# Altium PCB bunny_brain_D.PCBdoc (part 1 of 2)
Units mil, origin at the board's own origin, x right, y up, seen from the top; angles counter-clockwise.
Board outline 866.14 x 866.14 mil, 6 copper layers (Top Layer, GND1, SIG2/PWR, SIG1/PWR, GND2, Bottom Layer), stack 29.528 mil thick; 62 components, 94 nets, 390 pads, 189 vias.
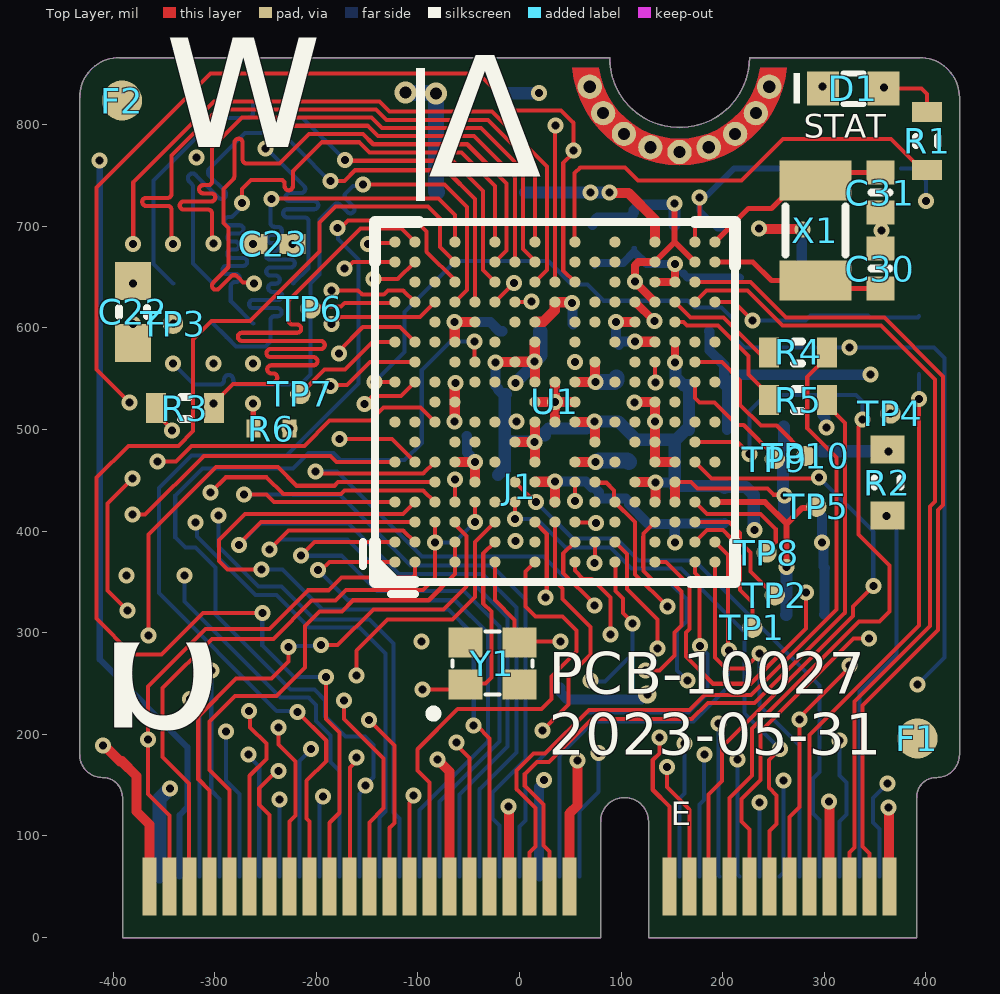
[diagram p0: Top Layer view]
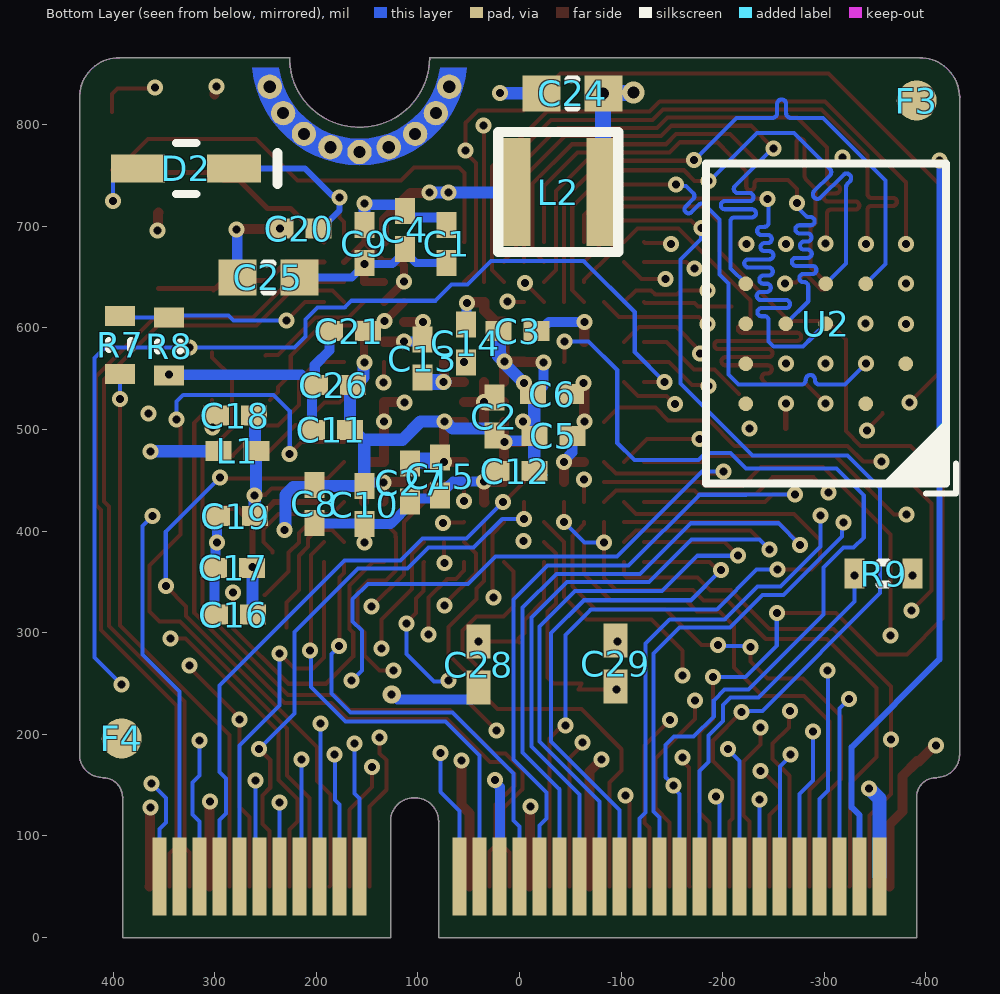
[diagram p1: Bottom Layer view, seen from below]
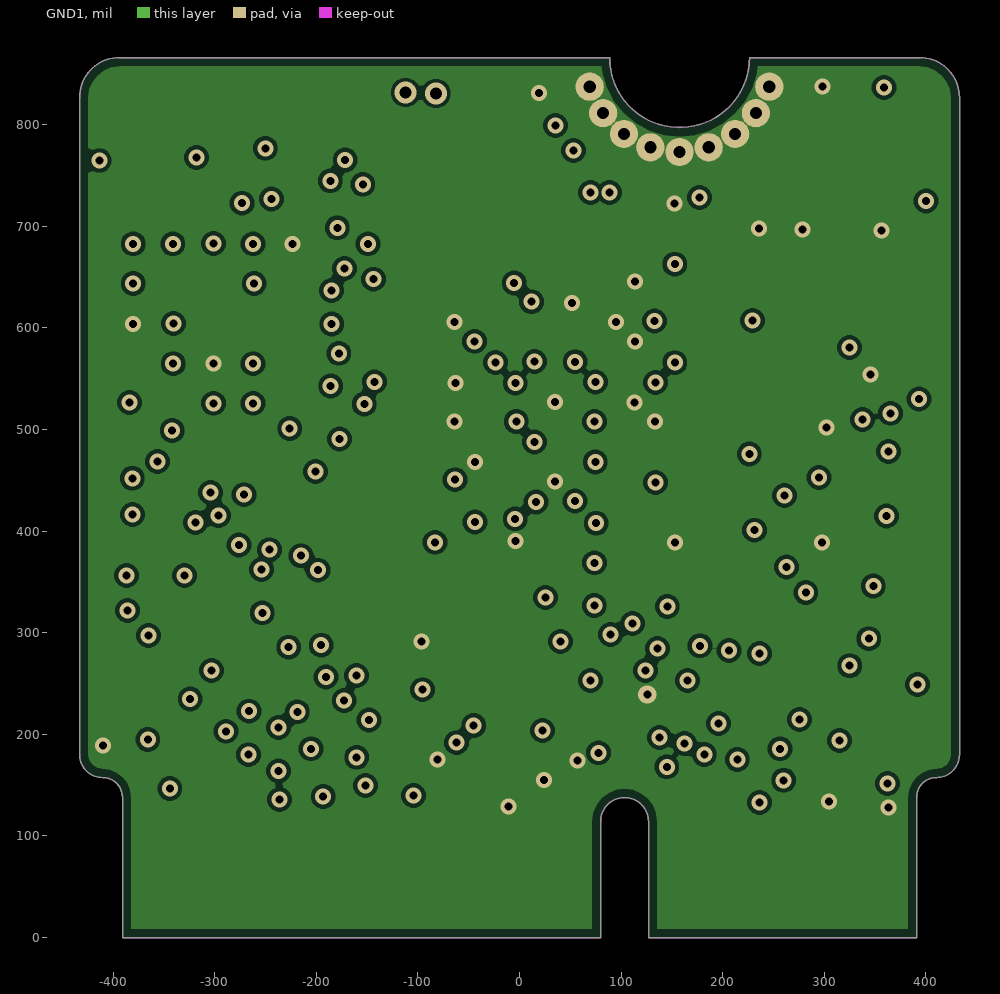
[diagram p2: GND1]
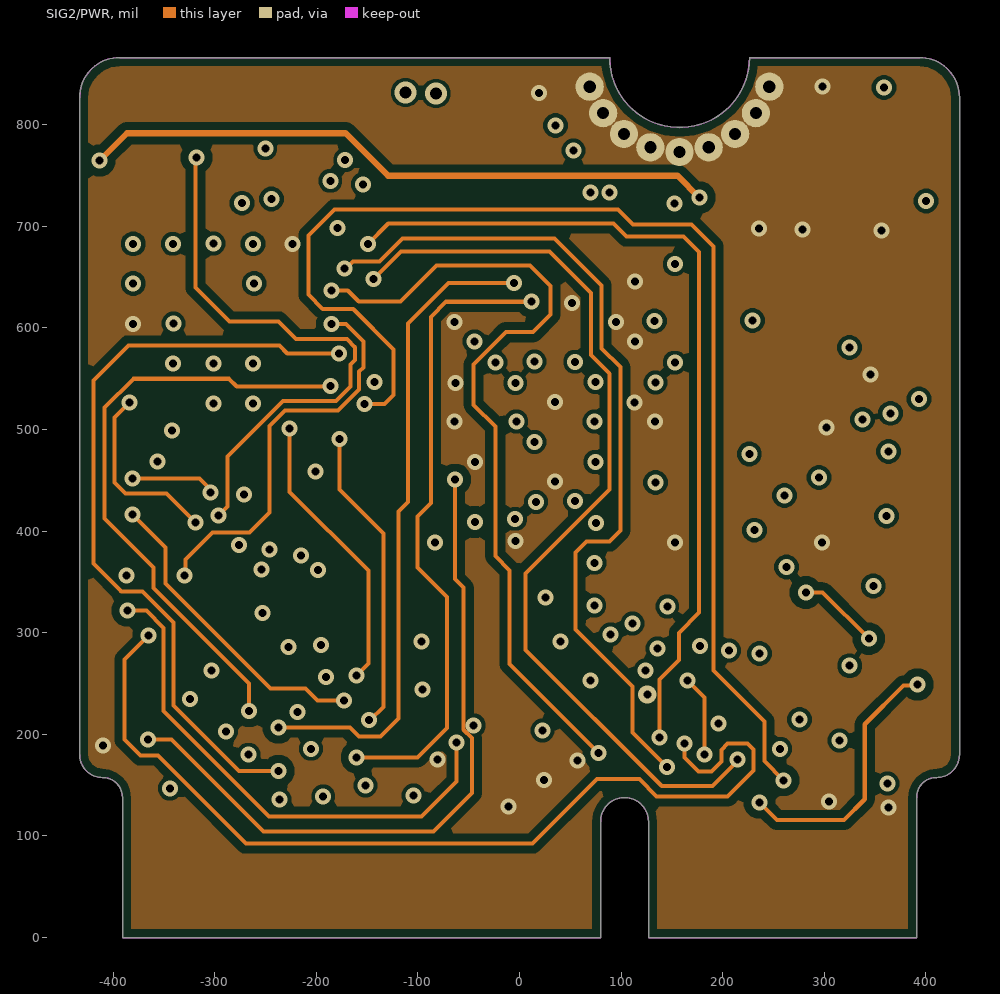
[diagram p3: SIG2/PWR]
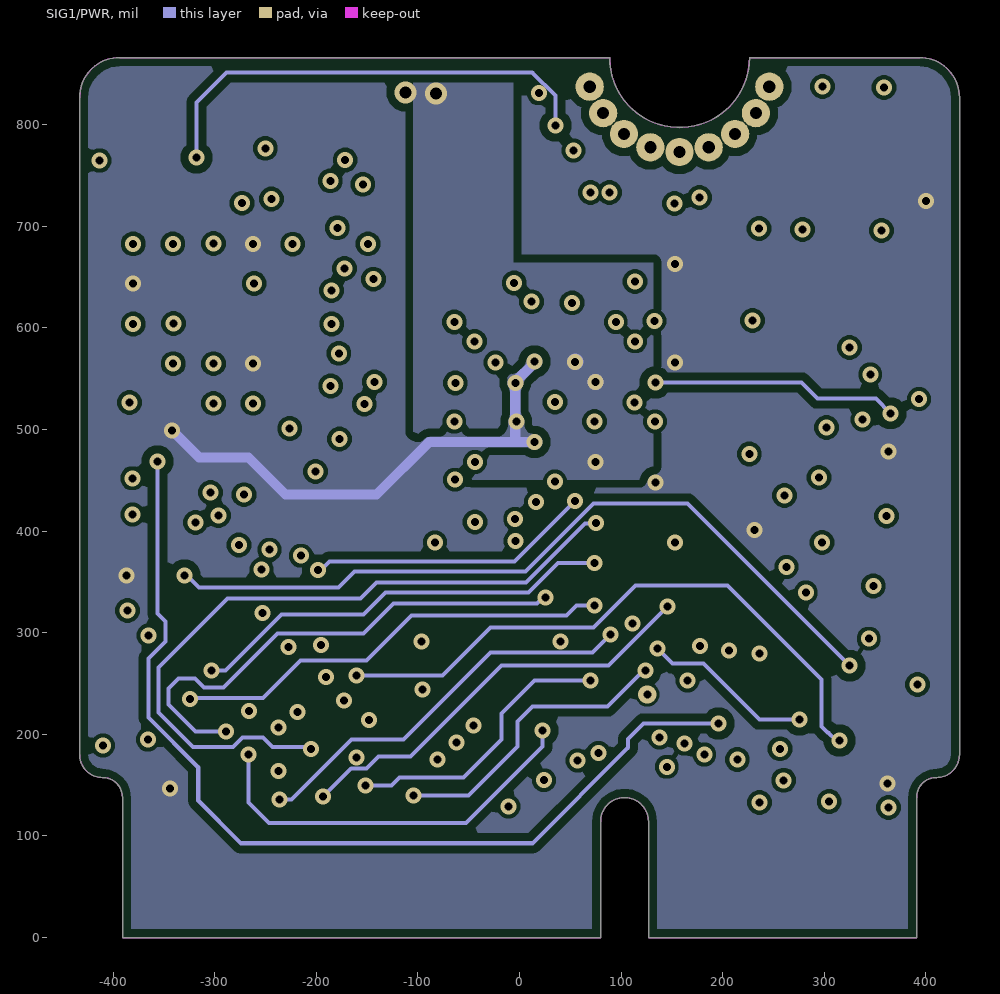
[diagram p4: SIG1/PWR]
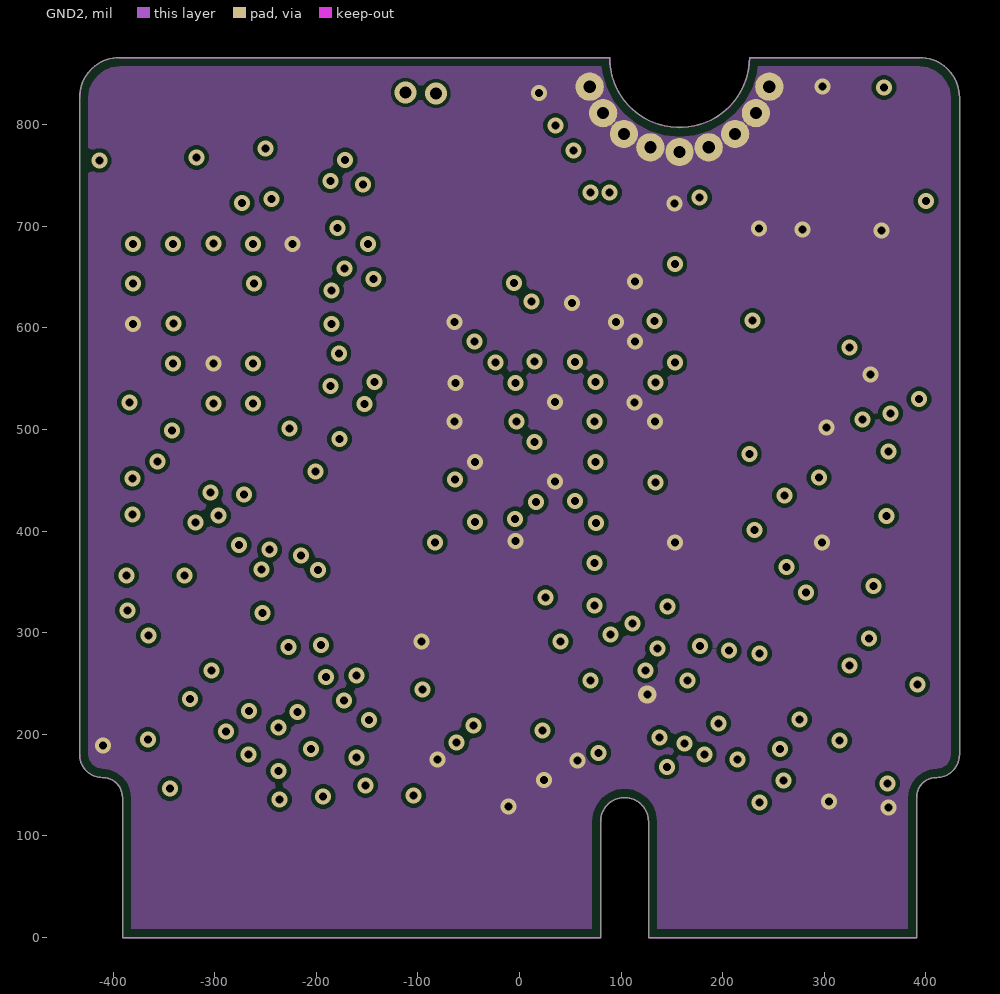
[diagram p5: GND2]
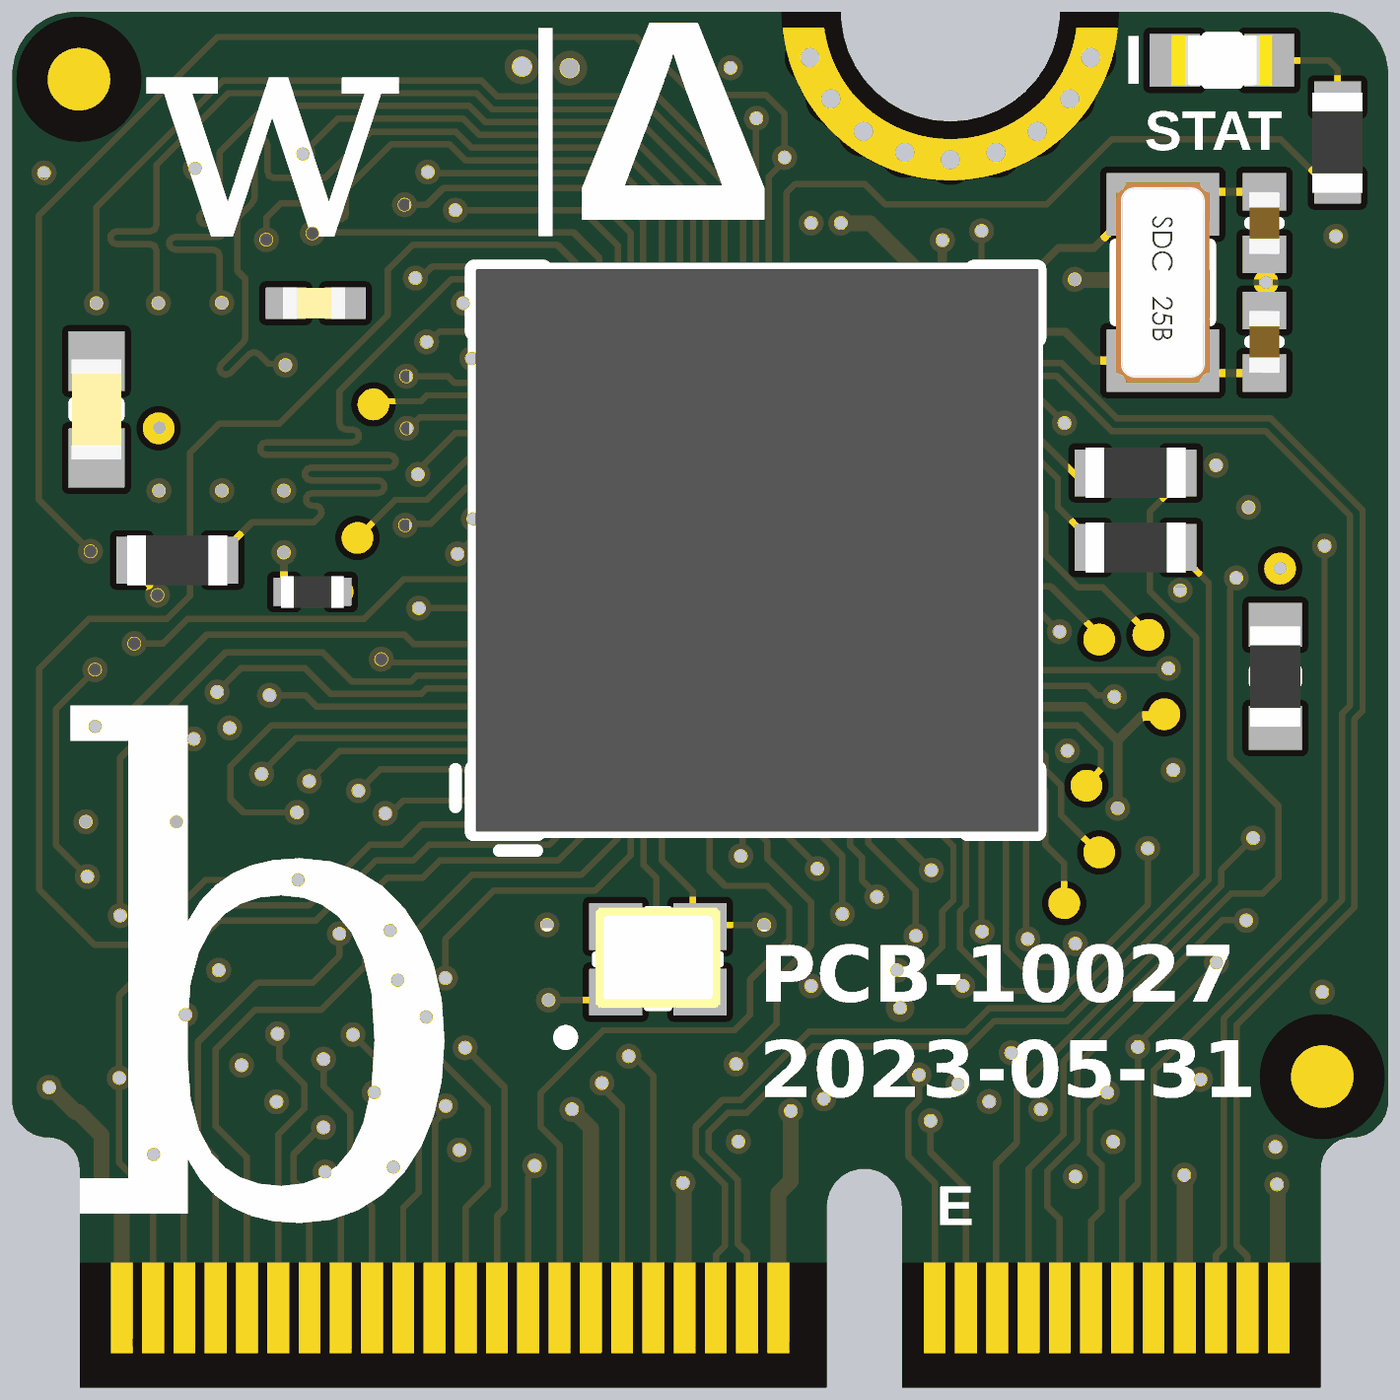
[diagram p7: 3D render of the assembled board from above, using the file's embedded part models]
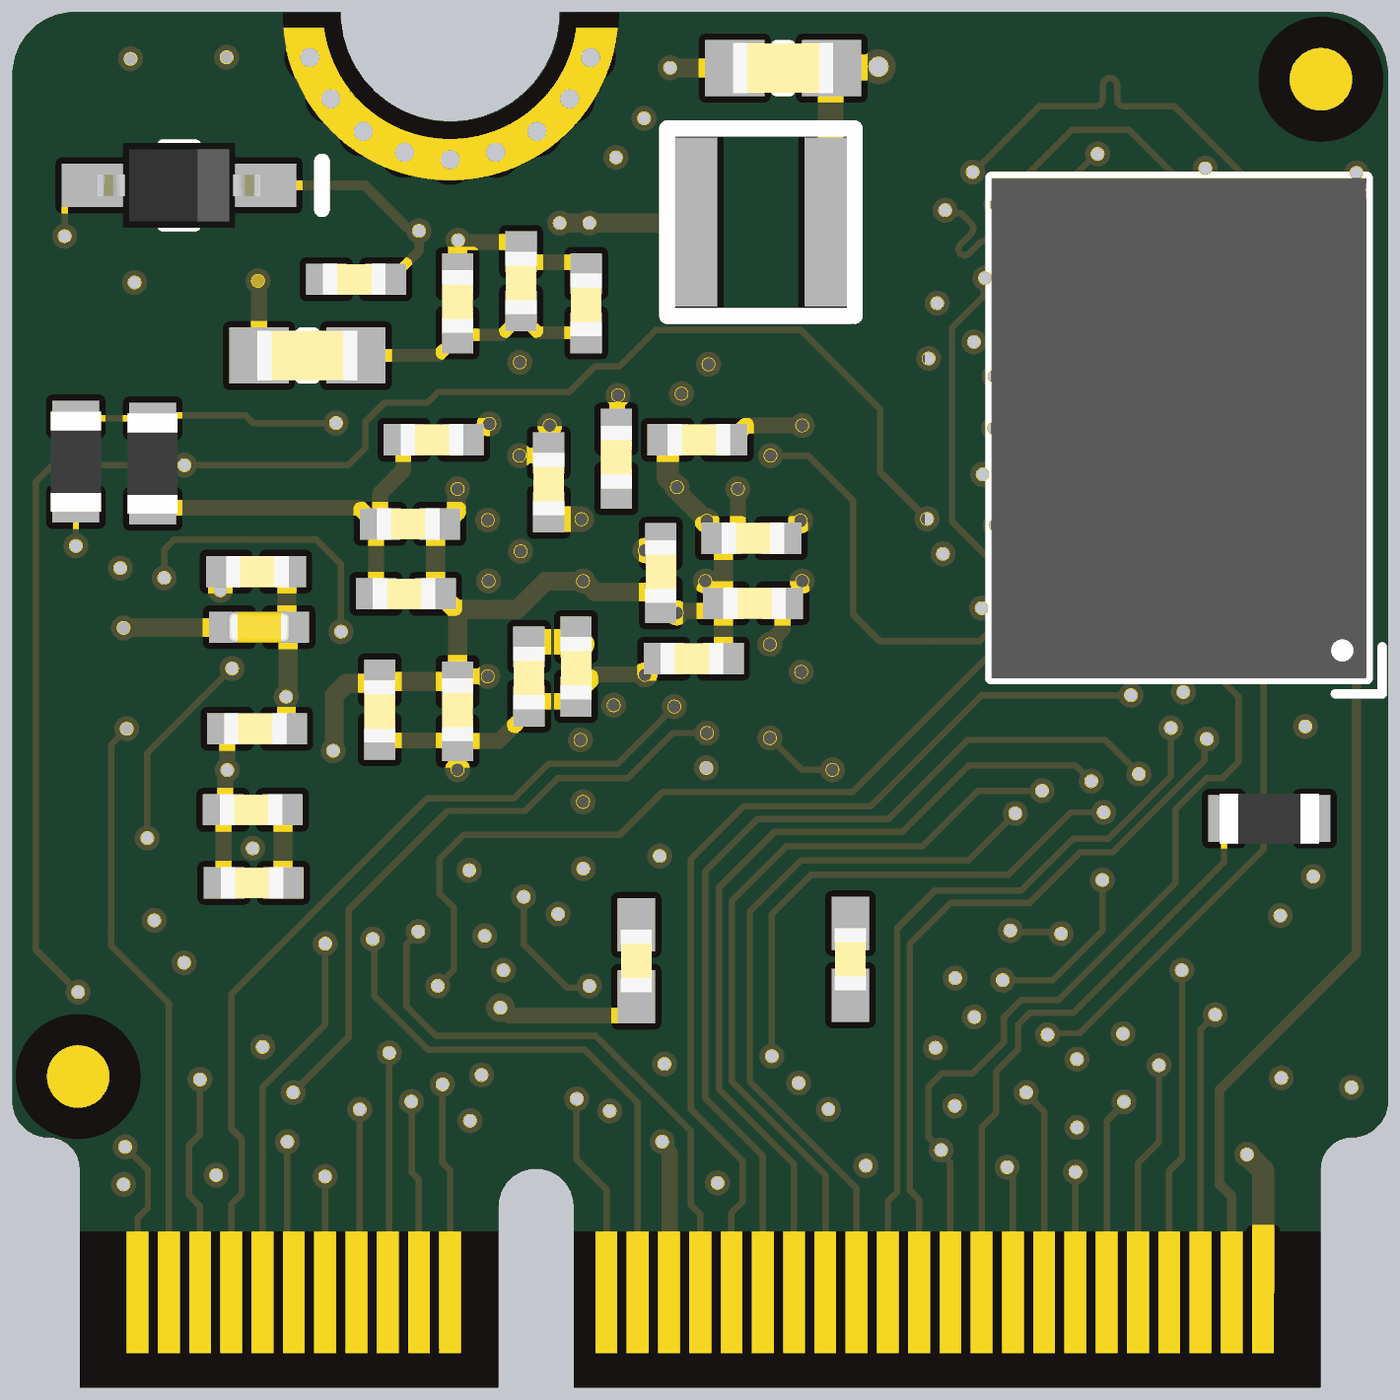
[diagram p8: 3D render of the assembled board from below, using the file's embedded part models]

## Layer stack, top to bottom
Top Solder: solder mask 0.9843, Solder Resist, Dk 3.5
Top Layer: signal copper 0.9843
Dielectric 1: prepreg 1.9685, PP-006, Dk 4.1
GND1: signal copper 1.9685
Dielectric 3: prepreg 3.937, PP-006, Dk 4.1
SIG2/PWR: signal copper 1.9685
Dielectric1: dielectric 7.874, FR-4, Dk 4.8
SIG1/PWR: signal copper 1.9685
Dielectric 4: prepreg 3.937, PP-006, Dk 4.1
GND2: signal copper 1.9685
Dielectric 2: prepreg 1.9685, PP-006, Dk 4.1
Bottom Layer: signal copper 0.9843
Bottom Solder: solder mask 0.9843, Solder Resist, Dk 3.5

## Board outline
-390.75,0 79.72,0 79.72,114.17 cw(c103.35,114.17) 126.97,114.17 126.97,0 390.75,0 390.75,137.8 cw(c410.43,137.8) 410.43,157.48 ccw(c410.43,180.12) 433.07,180.12 433.07,826.77 ccw(c393.7,826.77) 393.7,866.14 226.38,866.14 cw(c157.48,866.14) 88.58,866.14 -393.7,866.14 ccw(c-393.7,826.77) -433.07,826.77 -433.07,180.12 ccw(c-410.43,180.12) -410.43,157.48 cw(c-410.43,137.8) -390.75,137.8

## Design rules (kind name [scope] priority, off if disabled: settings)
Clearance [All] p1: gap=4 ignorepadtopadclearanceinfootprint=FALSE except(7.99: Track-Region; 8: Arc-Poly Arc-Region Track-Poly SMDPad-Poly SMDPad-Region THPad-Poly THPad-Region Via-Poly Via-Region Fill-Poly Fill-Region Poly-Poly Poly-Region Region-Region)
ComponentClearance ComponentClearance_1 [InComponent('J1')] p1: gap=-1 collisioncheckmode=3 verticalgap=-1 showdistances=FALSE
ComponentClearance [All] p2: gap=3 collisioncheckmode=3 verticalgap=5 showdistances=FALSE
DiffPairsRouting [All] p1: maxlimit=10 minlimit=10 mostfreqgap=10 toplayer_minwidth=15 toplayer_maxwidth=15 toplayer_prefwidth=15 midlayer1_minwidth=15 midlayer1_maxwidth=15 midlayer1_prefwidth=15 midlayer2_minwidth=15 midlayer2_maxwidth=15 midlayer2_prefwidth=15 midlayer3_minwidth=15 midlayer3_maxwidth=15 midlayer3_prefwidth=15 midlayer4_minwidth=15 midlayer4_maxwidth=15 midlayer4_prefwidth=15 bottomlayer_minwidth=15 bottomlayer_maxwidth=15 bottomlayer_prefwidth=15 maxuncoupledlength=500
MatchedLengths [InNetClass('OCTAL_SPI')] p1: tolerance=78.74 checknetsindiffpair=FALSE checkdiffpairvsdiffpair=TRUE checkxsignals=TRUE checkothers=TRUE
PlaneClearance [All] p1: clearance=10
PlaneConnect [All] p1: planeconnectstyle=Direct reliefexpansion=20 reliefentries=4 reliefconductorwidth=10 reliefairgap=10
PolygonConnect [All] p1: connectstyle=Direct reliefconductorwidth=10 reliefentries=4 polygonreliefangle="90 Angle" airgapwidth=5
RoutingVias [All] p1: holewidth=7.87 width=15.75 viastyle="Through Hole" minholewidth=6 minwidth=6 maxholewidth=50 maxwidth=75
SilkToSolderMaskClearance SilkscreenOverComponentPads [IsPad] p1: minsilkscreentomaskgap=10 clearancetoexposedcopper=TRUE
SolderMaskExpansion [All] p1: expansion=4 istentingtop=FALSE
SupplyNets "Schematic Supply Nets_7" [InNet('+5vUSB')] p1: voltage=0.000
SupplyNets "Schematic Supply Nets_6" [InNet('VDD_CORE')] p2: voltage=0.000
SupplyNets "Schematic Supply Nets_5" [InNet('VDD_VBAT')] p3: voltage=0.000
SupplyNets "Schematic Supply Nets_4" [InNet('+3v3')] p4: voltage=0.000
SupplyNets "Schematic Supply Nets_3" [InNet('VREFO')] p5: voltage=0.000
SupplyNets "Schematic Supply Nets_2" [InNet('VDDA')] p6: voltage=0.000
SupplyNets "Schematic Supply Nets_1" [InNet('GND')] p7: voltage=0.000
SupplyNets "Schematic Supply Nets" [InNet('VDD_SYS')] p8: voltage=0.000
Width [All] p1: maxlimit=200 minlimit=4 preferedwidth=4
25 further rules are at their usual default settings.

## Classes and differential pairs
differential pair class USB1: USB1
differential pair class USB0: USB0
net class OCTAL_SPI: FLEXSPI0A-D0 FLEXSPI0A-D1 FLEXSPI0A-D2 FLEXSPI0A-D3 FLEXSPI0A-D4 FLEXSPI0A-D5 FLEXSPI0A-D6 FLEXSPI0A-D7 FLEXSPI0A-DQS FLEXSPI0A-SCK FLEXSPI0A-SS0-N
differential pair USB1: +USB1_P -USB1_N
differential pair USB0: +USB0_P -USB0_N

## Components (designator, comment, footprint, x,y, rotation, side; value= is the part's Value field where it differs from the comment)
C1 "1µF" C0402_0.55MM_HD 71.8,682.77 r90 bottom
C2 "0.1µF" C0402_0.55MM_HD 24.8,512.77 r270 bottom
C3 "0.1µF" C0402_0.55MM_HD 1.8,596.77 r0 bottom
C4 "1µF" C0402_0.55MM_HD 112.8,696.47 r90 bottom
C5 "0.1µF" C0402_0.55MM_HD -33.2,493.77 r0 bottom
C6 "0.1µF" C0402_0.55MM_HD -32.2,534.77 r0 bottom
C8 "0.1µF" C0402_0.55MM_HD 201.8,426.77 r90 bottom
C9 "0.1µF" C0402_0.55MM_HD 152.8,682.77 r270 bottom
C10 "1µF" C0402_0.55MM_HD 152.8,425.77 r270 bottom
C11 "0.1µF" C0402_0.55MM_HD 185.44,499.77 r180 bottom
C12 "0.1µF" C0402_0.55MM_HD 4.18,458.95 r180 bottom
C13 "1µF" C0402_0.55MM_HD 95.4,569.83 r90 bottom
C14 "0.1µF" C0402_0.55MM_HD 52.8,584.77 r270 bottom
C15 "0.1µF" C0402_0.55MM_HD 78.18,453.95 r90 bottom
C16 "0.1µF" C0402_0.55MM_HD 281.16,317.77 r180 bottom
C17 "0.1µF" C0402_0.55MM_HD 281.8,363.77 r180 bottom
C18 "1µF" C0402_0.55MM_HD 279.8,513.77 r0 bottom
C19 "0.1µF" C0402_0.55MM_HD 279.16,414.77 r180 bottom
C20 "0.1µF" C0402_0.55MM_HD 216.8,697.77 r180 bottom
C21 "0.1µF" C0402_0.55MM_HD 167.8,596.77 r180 bottom
C22 "4.7µF" C0603_1.00MM_MD -380.2,615.77 r270 top
C23 "0.1µF" C0402_0.55MM_HD -242.2,682.77 r0 top
C24 "10µF" C0603_0.90MM_MD -52.2,830.77 r180 bottom
C25 "4.7µF" C0603_1.00MM_MD 247.31,649.77 r0 bottom
C26 "0.1µF" C0402_0.55MM_HD 182.8,543.77 r180 bottom
C27 "0.1µF" C0402_0.55MM_HD 107.8,447.77 r90 bottom
C28 "12pF" C0402_0.55MM_MD 40.28,268.65 r270 bottom
C29 "12pF" C0402_0.55MM_MD -94.56,269.64 r90 bottom
C30 "9.5pF" PERFECT_0402 355.24,658.42 r90 top
C31 "9.5pF" PERFECT_0402 355.24,733.22 r270 top
D1 "APT1608CGCK" "LED_0603 - GREEN" 328.74,835.63 r180 top
D2 "BAT760-7" D_SOD-323_P 328.18,756.95 r180 bottom
F1 "PCB Fiducial" "Fiducial 1mm - 2mm" 391.66,195.82 r180 top
F2 "PCB Fiducial" "Fiducial 1mm - 2mm" -391.2,823.77 r180 top
F3 "PCB Fiducial" "Fiducial 1mm - 2mm" -390.82,823.77 r0 bottom
F4 "PCB Fiducial" "Fiducial 1mm - 2mm" 391.66,195.82 r0 bottom
J1 "Micromod 2222 Card Edge Fingers" MICROMOD-CARD--M2--2222 0,0 r0 top locked
L1 "ACML-0402HC-221-T" C0402_HD 277.8,478.77 r180 bottom
L2 "2.2µH 1.5A" L_NRH3012 -38.2,733.77 r0 bottom
R1 "1k" R0603_0.55MM_HD 401.24,783.95 r270 top
R2 "10k" R0603_0.55MM_MD 362.13,447.79 r90 top
R3 "10k" R0603_0.55MM_HD -329.36,520.95 r180 top
R4 "33" R0603_0.55MM_HD 274.18,575.95 r180 top
R5 "33" R0603_0.55MM_HD 274.18,528.95 r180 top
R6 "0" R0402_0.40MM_HD -244.17,500.94 r180 top
R7 "10k" R0603_0.55MM_HD 393.18,582.95 r270 bottom
R8 "20k" R0603_0.55MM_HD 344.8,581.77 r90 bottom
R9 "10k" R0603_0.55MM_HD -358.34,358.22 r180 bottom
TP1 "SMT_TEST" "SMT_TP - 20"#1 229.18,304.95 r270 top
TP2 "SMT_TEST" "SMT_TP - 20"#1 251.18,336.95 r180 top
TP3 "SMT_TEST" "SMT_TP - 20"#2 -341.98,604 r180 top
TP4 "SMT_TEST" "SMT_TP - 20"#1 365.09,515.7 r180 top
TP5 "SMT_TEST" "SMT_TP - 20"#1 292.18,423.95 r270 top
TP6 "SMT_TEST" "SMT_TP - 20"#1 -205.78,619.05 r180 top
TP7 "SMT_TEST" "SMT_TP - 20"#1 -215.82,534.95 r180 top
TP8 "SMT_TEST" "SMT_TP - 20"#1 243.18,378.95 r180 top
TP9 "SMT_TEST" "SMT_TP - 20"#1 251.18,470.95 r180 top
TP10 "SMT_TEST" "SMT_TP - 20"#1 282.18,473.95 r180 top
U1 "MCXN947VDFT" VFBGA184 34.86,527.08 r90 top locked
U2 "APS6408L-3OBM-BA" BGA24C100P5X5_600X800X120 -301.46,604.14 r0 bottom locked
X1 "32.768kHz" XTAL_3215 291.27,695.82 r270 top
Y1 "24MHz" ECS-1637B -26.65,269.64 r0 top

## Footprints (in the part's own frame and the unit in brackets; to place one, negate y for a bottom-side part, rotate by r counter-clockwise, add the part's x,y. Pads: shape width x height; smd on the part's side, far side on the other; paste and mask are expansions set on the pad)
BGA24C100P5X5_600X800X120 [mm]
  round 0.37 smd: A2(-1,2) A3(0,2) A4(1,2) A5(2,2) B1(-2,1) B2(-1,1) B3(0,1) B4(1,1) B5(2,1) C1(-2,0) C2(-1,0) C3(0,0) C4(1,0) C5(2,0) D1(-2,-1) D2(-1,-1) D3(0,-1) D4(1,-1) D5(2,-1) E1(-2,-2) E2(-1,-2) E3(0,-2) E4(1,-2) E5(2,-2)
  silkscreen extent -3.25,-4 3,4.25, body extent -3,-4 3,4, height 1.2
C0402_0.55MM_HD [mm] "Capacitor 0402 0.55mm Height- High Density"
  rect 0.65x0.5 smd: 1(-0.475,0) 2(0.475,0)
  body extent -0.52,-0.25 0.48,0.25, height 0.55
C0402_0.55MM_MD [mm] "Capacitor - 0402 - Medium Density"
  rect 0.85x0.6 smd: 1(-0.575,0) 2(0.575,0)
  body extent -0.5,-0.25 0.5,0.25, height 0.55
C0402_HD [mm] "Capacitor 0402 - High Density"
  rect 0.65x0.5 smd: 1(-0.475,0) 2(0.475,0)
  body extent -0.5,-0.25 0.5,0.25, height 0.55
C0603_0.90MM_MD [mm] "Capacitor 0603 - Medium Density"
  rect 0.95x0.9 smd: 1(-0.775,0) 2(0.775,0)
  silkscreen extent -0.1,-0.35 0.1,0.35, body extent -0.8,-0.4 0.8,0.4, height 0.9
C0603_1.00MM_MD [mm] "Capacitor 0603 - Medium Density"
  rect 0.95x0.9 smd: 1(-0.775,0) 2(0.775,0)
  silkscreen extent -0.1,-0.35 0.1,0.35, body extent -0.8,-0.4 0.8,0.4, height 1
D_SOD-323_P [mm] "SOD-123 Diode - Polarized"
  rect 1.35x0.7 smd: 1(-1.2,0) 2(1.2,0)
  silkscreen extent -0.25,-0.64 2.29,0.64, body extent -1.3,-0.68 1.3,0.67, height 1.1
ECS-1637B [mm]
  rect 0.85x0.75 smd: 1(-0.675,-0.525) 2(0.675,-0.525) 3(0.675,0.525) 4(-0.675,0.525)
  silkscreen extent -1.57,-1.35 1,0.8, body extent -1,-0.77 1,0.83, height 0.5
"Fiducial 1mm - 2mm" [mm] "1mm Pad 2mm Opening"
  round 1 smd paste-10 mask+0.5: 1(0,0)
L_NRH3012 [mm] "Inductor"
  rect 0.8x2.7 smd: 1(-1.1,0) 2(1.1,0)
  silkscreen extent -1.5,-1.5 1.5,1.5, body extent -1.5,-1.5 1.5,1.5, height 1.2
"LED_0603 - GREEN" [mm] "LED_0603 - GREEN"
  rect 0.8x0.85 smd: A(-0.75,0) C(0.762,0)
  silkscreen extent -0.25,-0.38 0.25,0.38, body extent -0.8,-0.4 0.81,0.4, height 0.76
MICROMOD-CARD--M2--2222 [mm] "Micromod board outline with card edge fingers"
  rect 0.35x1.45 smd paste-2539.97 mask+0: 1(9.25,1.275) 3(8.75,1.275) 5(8.25,1.275) 7(7.75,1.275) 9(7.25,1.275) 11(6.75,1.275) 13(6.25,1.275) 15(5.75,1.275) 17(5.25,1.275) 19(4.75,1.275) 21(4.25,1.275) 23(3.75,1.275) 33(1.25,1.275) 35(0.75,1.275) 37(0.25,1.275) 39(-0.25,1.275) 41(-0.75,1.275) 43(-1.25,1.275) 45(-1.75,1.275) 47(-2.25,1.275) 49(-2.75,1.275) 51(-3.25,1.275) 53(-3.75,1.275) 55(-4.25,1.275) 57(-4.75,1.275) 59(-5.25,1.275) 61(-5.75,1.275) 63(-6.25,1.275) 65(-6.75,1.275) 67(-7.25,1.275) 69(-7.75,1.275) 71(-8.25,1.275) 73(-8.75,1.275) 75(-9.25,1.275)
  rect 0.35x1.95 smd far side paste-2539.97 mask+0: 2(9,1.525) 4(8.5,1.525) 6(8,1.525) 8(7.5,1.525) 10(7,1.525) 12(6.5,1.525) 14(6,1.525) 16(5.5,1.525) 18(5,1.525) 20(4.5,1.525) 22(4,1.525) 32(1.5,1.525) 34(1,1.525) 36(0.5,1.525) 38(0,1.525) 40(-0.5,1.525) 42(-1,1.525) 44(-1.5,1.525) 46(-2,1.525) 48(-2.5,1.525) 50(-3,1.525) 52(-3.5,1.525) 54(-4,1.525) 56(-4.5,1.525) 58(-5,1.525) 60(-5.5,1.525) 62(-6,1.525) 64(-6.5,1.525) 66(-7,1.525) 68(-7.5,1.525) 70(-8,1.525) 72(-8.5,1.525)
  rect 0.35x1.95 smd far side paste-2539.97: 74(-9,1.525)
  round 0.61 / inner round 0.708 / far side round 0.61 hole 0.305: SCREW(1.755,21.271) SCREW(2.09,20.611) SCREW(2.611,20.089) SCREW(3.271,19.755) SCREW(4,19.638) SCREW(4.729,19.755) SCREW(5.389,20.089) SCREW(5.91,20.611) SCREW(6.245,21.271)
  Top Layer region: 1.32,21.746 1.758,20.51 2.728,19.627 4,19.308 5.272,19.627 6.242,20.51 6.68,21.746 6.68,21.746 6.016,21.746 5.669,20.841 4.942,20.199 4,19.968 3.058,20.199 2.331,20.841 1.984,21.746 1.984,21.746
  Bottom Layer region: 1.32,21.746 1.758,20.51 2.728,19.627 4,19.308 5.272,19.627 6.242,20.51 6.68,21.746 6.68,21.746 6.016,21.746 5.669,20.841 4.942,20.199 4,19.968 3.058,20.199 2.331,20.841 1.984,21.746 1.984,21.746
PERFECT_0402 [mm] "https://www.worthingtonassembly.com/perfect-0402-footprint"
  rect 0.6x0.7 smd: 1(-0.5,0) 2(0.5,0)
  silkscreen extent 0,-0.23 0,0.23, body extent -0.5,-0.25 0.5,0.25, height 0.5
R0402_0.40MM_HD [mm] "Resistor 0402 High Density"
  rect 0.35x0.45 smd: 1(-0.45,0) 2(0.45,0)
  body extent -0.5,-0.25 0.5,0.25, height 0.4
R0603_0.55MM_HD [mm] "Resistor 0603 High Density"
  rect 0.5x0.75 smd: 1(-0.725,0) 2(0.725,0)
  silkscreen extent -0.1,-0.28 0.1,0.28, body extent -0.8,-0.4 0.8,0.4, height 0.55
R0603_0.55MM_MD [mm] "Resistor 0603 Medium Density"
  rect 0.7x0.85 smd: 1(-0.825,0) 2(0.825,0)
  silkscreen extent -0.1,-0.33 0.1,0.33, body extent -0.8,-0.4 0.8,0.4, height 0.55
"SMT_TP - 20"#1 [mil] ".020\" SMT Test pad"
  round 20 smd paste-25: 1(0,0)
"SMT_TP - 20"#2 [mil] ".020\" SMT Test pad"
  round 20 smd paste-25: 1(-0.98,0)
VFBGA184 [mm] "VFBGA184"
  round 0.28 smd mask+0.05: A1(-4,4) A2(-3.5,4) A4(-2.5,4) A6(-1.5,4) A8(-0.5,4) A10(0.5,4) A12(1.5,4) A14(2.5,4) A16(3.5,4) A17(4,4) B1(-4,3.5) B2(-3.5,3.5) B3(-3,3.5) B4(-2.5,3.5) B6(-1.5,3.5) B7(-1,3.5) B8(-0.5,3.5) B10(0.5,3.5) B11(1,3.5) B12(1.5,3.5) B14(2.5,3.5) B15(3,3.5) B16(3.5,3.5) B17(4,3.5) C3(-3,3) C4(-2.5,3) C5(-2,3) C6(-1.5,3) C8(-0.5,3) C9(0,3) C10(0.5,3) C12(1.5,3) C13(2,3) C14(2.5,3) C15(3,3) D1(-4,2.5) D2(-3.5,2.5) D3(-3,2.5) D4(-2.5,2.5) D6(-1.5,2.5) D7(-1,2.5) D9(0,2.5) D11(1,2.5) D12(1.5,2.5) D14(2.5,2.5) D15(3,2.5) D16(3.5,2.5) D17(4,2.5) E4(-2.5,2) E5(-2,2) E7(-1,2) E8(-0.5,2) E10(0.5,2) E11(1,2) E13(2,2) E14(2.5,2) F1(-4,1.5) F2(-3.5,1.5) F3(-3,1.5) F4(-2.5,1.5) F6(-1.5,1.5) F8(-0.5,1.5) F10(0.5,1.5) F12(1.5,1.5) F14(2.5,1.5) F15(3,1.5) F16(3.5,1.5) F17(4,1.5) G2(-3.5,1) G4(-2.5,1) G5(-2,1) G7(-1,1) G11(1,1) G13(2,1) G14(2.5,1) G16(3.5,1) H1(-4,0.5) H2(-3.5,0.5) H3(-3,0.5) H5(-2,0.5) H6(-1.5,0.5) H8(-0.5,0.5) H9(0,0.5) H10(0.5,0.5) H12(1.5,0.5) H13(2,0.5) H15(3,0.5) H16(3.5,0.5) H17(4,0.5) J3(-3,0) J4(-2.5,0) J8(-0.5,0) J10(0.5,0) J14(2.5,0) J15(3,0) K1(-4,-0.5) K2(-3.5,-0.5) K3(-3,-0.5) K5(-2,-0.5) K6(-1.5,-0.5) K8(-0.5,-0.5) K9(0,-0.5) K10(0.5,-0.5) K12(1.5,-0.5) K13(2,-0.5) K15(3,-0.5) K16(3.5,-0.5) K17(4,-0.5) L2(-3.5,-1) L4(-2.5,-1) L5(-2,-1) L7(-1,-1) L11(1,-1) L13(2,-1) L14(2.5,-1) L16(3.5,-1) M1(-4,-1.5) M2(-3.5,-1.5) M3(-3,-1.5) M4(-2.5,-1.5) M6(-1.5,-1.5) M8(-0.5,-1.5) M10(0.5,-1.5) M12(1.5,-1.5) M14(2.5,-1.5) M15(3,-1.5) M16(3.5,-1.5) M17(4,-1.5) N4(-2.5,-2) N5(-2,-2) N7(-1,-2) N8(-0.5,-2) N10(0.5,-2) N11(1,-2) N13(2,-2) N14(2.5,-2) P1(-4,-2.5) P2(-3.5,-2.5) P3(-3,-2.5) P4(-2.5,-2.5) P6(-1.5,-2.5) P7(-1,-2.5) P9(0,-2.5) P11(1,-2.5) P12(1.5,-2.5) P14(2.5,-2.5) P15(3,-2.5) P16(3.5,-2.5) P17(4,-2.5) R3(-3,-3) R4(-2.5,-3) R5(-2,-3) R6(-1.5,-3) R8(-0.5,-3) R9(0,-3) R10(0.5,-3) R12(1.5,-3) R13(2,-3) R14(2.5,-3) R15(3,-3) T1(-4,-3.5) T2(-3.5,-3.5) T3(-3,-3.5) T4(-2.5,-3.5) T6(-1.5,-3.5) T7(-1,-3.5) T8(-0.5,-3.5) T10(0.5,-3.5) T11(1,-3.5) T12(1.5,-3.5) T14(2.5,-3.5) T15(3,-3.5) T16(3.5,-3.5) T17(4,-3.5) U1(-4,-4) U2(-3.5,-4) U4(-2.5,-4) U6(-1.5,-4) U8(-0.5,-4) U10(0.5,-4) U12(1.5,-4) U14(2.5,-4) U16(3.5,-4) U17(4,-4)
  silkscreen extent -4.8,-4.5 4.5,4.8, body extent -4.5,-4.53 4.5,4.47, height 0.91
XTAL_3215 [mm] "XTAL SMD 3.2 x 1.5 mm"
  rect 1x1.8 smd: 1(-1.25,0) 2(1.25,0)
  silkscreen extent -0.6,-0.75 0.6,0.75, body extent -1.6,-0.75 1.6,0.75, height 0.81

## Part data
C1 C4 C10 C13 C18: library part GCM155C71A105KE38D, "CAP CER 1UF 10V X7S 0402", Manufacturer="Murata Electronics", Operating Temperature="-55°C ~ 125°C", Package=0402, Ratings=AEC-Q200, Supplier Part Number 1=490-13409-1-ND, Temperature Coefficient=X7S, Tolerance=±10%, Voltage - Rated=10V, Category=Capacitors, ComponentLink1Description="Datasheet (Internal)", ComponentLink1URL=https://www.murata.com/~/media/webrenewal/support/library/catalog/products/capacitor/mlcc/c03e.ashx?la=en-us, ComponentLink2Description="Datasheet (External)", ComponentLink2URL=https://www.murata.com/~/media/webrenewal/support/library/catalog/products/capacitor/mlcc/c03e.ashx?la=en-us, Manufacturer Part Number=GCM155C71A105KE38D, Substitution Notes="1µF , 10V , ±10% , X7S , -55°C ~ 125°C , AEC-Q200 , 0402", Supplier 1=Digikey, Thickness (Max)=0.55MM
C2 C3 C5 C6 C8 C9 C11 C12 C14 C15 C16 C17 C19 C20 C21 C23 C26 C27: library part GCM155R71A104KA55D, "CAP CER 0.1UF 10V X7R 0402", Manufacturer="Murata Electronics", Operating Temperature="-55°C ~ 125°C", Package=0402, Ratings=AEC-Q200, Supplier Part Number 1=490-16434-1-ND, Temperature Coefficient=X7R, Tolerance=±10%, Voltage - Rated=10V, Category=Capacitors, ComponentLink1Description="Datasheet (Internal)", ComponentLink1URL=https://search.murata.co.jp/Ceramy/image/img/A01X/G101/ENG/GCM155R71A104KA55-01.pdf, ComponentLink2Description="Datasheet (External)", ComponentLink2URL=https://search.murata.co.jp/Ceramy/image/img/A01X/G101/ENG/GCM155R71A104KA55-01.pdf, Manufacturer Part Number=GCM155R71A104KA55D, Substitution Notes="0.1µF , 10V , ±10% , X7R , -55°C ~ 125°C , AEC-Q200 , 0402", Supplier 1=Digikey, Thickness (Max)=0.55MM
C22 C25: library part GCJ188C70J475KE02D, "CAP CER 4.7UF 6.3V X7S 0603", Manufacturer="Murata Electronics", Operating Temperature="-55°C ~ 125°C", Package=0603, Ratings=AEC-Q200, Supplier Part Number 1=490-16480-1-ND, Temperature Coefficient=X7S, Tolerance=±10%, Voltage - Rated=6.3V, Category=Capacitors, ComponentLink1Description="Datasheet (Internal)", ComponentLink1URL=https://search.murata.co.jp/Ceramy/image/img/A01X/G101/ENG/GCJ188C70J475KE02-01.pdf, ComponentLink2Description="Datasheet (External)", ComponentLink2URL=https://search.murata.co.jp/Ceramy/image/img/A01X/G101/ENG/GCJ188C70J475KE02-01.pdf, Manufacturer Part Number=GCJ188C70J475KE02D, Substitution Notes="4.7µF , 6.3V , ±10% , X7S , -55°C ~ 125°C , AEC-Q200 , 0603", Supplier 1=Digikey, Thickness (Max)=1.00MM
C24: library part GRT188R61A106ME13D, "CAP CER 10UF 10V X5R 0603", Manufacturer="Murata Electronics", Operating Temperature="-55°C ~ 85°C", Package=0603, Ratings=AEC-Q200, Supplier Part Number 1=490-12312-1-ND, Temperature Coefficient=X5R, Tolerance=±20%, Voltage - Rated=10V, Category=Capacitors, ComponentLink1Description="Datasheet (Internal)", ComponentLink1URL=https://search.murata.co.jp/Ceramy/image/img/A01X/G101/ENG/GRT188R61A106ME13-01.pdf, ComponentLink2Description="Datasheet (External)", ComponentLink2URL=https://search.murata.co.jp/Ceramy/image/img/A01X/G101/ENG/GRT188R61A106ME13-01.pdf, Manufacturer Part Number=GRT188R61A106ME13D, Substitution Notes="10µF , 10V , ±20% , X5R , -55°C ~ 85°C , AEC-Q200 , 0603", Supplier 1=Digikey, Thickness (Max)=0.90MM
C28 C29: library part GCM1555C1H120JA16D, "CAP CER 12PF 50V C0G/NP0 0402", Manufacturer="Murata Electronics", Operating Temperature="-55°C ~ 125°C", Package=0402, Ratings=AEC-Q200, Supplier Part Number 1=490-12649-1-ND, Temperature Coefficient="C0G, NP0", Tolerance=±5%, Voltage - Rated=50V, Category=Capacitors, ComponentLink1Description="Datasheet (Internal)", ComponentLink1URL=https://www.murata.com/~/media/webrenewal/support/library/catalog/products/capacitor/mlcc/c03e.ashx?la=en-us, ComponentLink2Description="Datasheet (External)", ComponentLink2URL=https://www.murata.com/~/media/webrenewal/support/library/catalog/products/capacitor/mlcc/c03e.ashx?la=en-us, Manufacturer Part Number=GCM1555C1H120JA16D, Substitution Notes="12pF , 50V , ±5% , C0G, NP0 , -55°C ~ 125°C , AEC-Q200 , 0402", Supplier 1=Digikey, Thickness (Max)=0.55MM
C30 C31: library part GCQ1555C1H9R5BB01D, "CAP CER 9.5PF 50V C0G/NP0 0402", Manufacturer="Murata Electronics", Operating Temperature="-55°C ~ 125°C", Package=0402, Ratings=AEC-Q200, Supplier Part Number 1=490-17528-1-ND, Temperature Coefficient="C0G, NP0", Tolerance=±0.1pF, Voltage - Rated=50V, Category=Capacitors, ComponentLink1Description="Datasheet (Internal)", ComponentLink1URL=https://search.murata.co.jp/Ceramy/image/img/A01X/G101/ENG/GCQ1555C1H9R5BB01-01.pdf, ComponentLink2Description="Datasheet (External)", ComponentLink2URL=https://search.murata.co.jp/Ceramy/image/img/A01X/G101/ENG/GCQ1555C1H9R5BB01-01.pdf, Manufacturer Part Number=GCQ1555C1H9R5BB01D, Substitution Notes="9.5pF , 50V , ±0.1pF , C0G, NP0 , -55°C ~ 125°C , AEC-Q200 , 0402", Supplier 1=Digikey, Thickness (Max)=0.55MM
D1: "LED 1.6X0.8MM 570NM GRN CLR SMD", Color=Green, Current - Test=20mA, Luminous Flux @ Current - Test=-, Manufacturer="Kingbright Corp", Millicandela Rating=50mcd, Package / Case="0603 (1608 Metric)", Supplier Part Number 1=754-1116-1-ND, Voltage - Forward (Vf) Typ=2.1V, Category=Optoelectronics, ComponentLink1Description=http://www.us.kingbright.com/images/catalog/SPEC/APT1608CGCK.pdf, ComponentLink1URL=http://www.us.kingbright.com/images/catalog/SPEC/APT1608CGCK.pdf, Height=0.75mm, Lens Style/Size="Rectangle with Flat Top, 1.2mm x 0.8mm", Lens Type=Clear, Manufacturer Part Number=APT1608CGCK, Mounting Type="Surface Mount", Packaging="Tape & Reel (TR)", Pricing 1="1=0.2, 10=0.153, 25=0.1224, 100=0.1105, 250=0.102, 500=0.0918 (USD)", RoHS="RoHS Compliant", Size / Dimension="1.60mm L x 0.80mm W", Stock 1=89450, Supplier 1=Digi-Key, Supplier 2=Digikey, Supplier Part Number 2=160-2162-1-ND, Viewing Angle=120°, Wavelength - Dominant=570nm, Wavelength - Peak=574nm
D2: "DIODE SCHOTTKY 30V 1A SOD323", Capacitance @ Vr- F="25pF @ 5V- 1MHz", Current - Average Rectified (Io)=1A, Current - Reverse Leakage @ Vr="50µA @ 15V", Manufacturer="Diodes Inc", Package="SC-76- SOD-323", Supplier Device Package=SOD-323, Supplier Part Number 1=BAT760DICT-ND, Voltage - DC Reverse (Vr) (Max)=30V, Voltage - Forward (Vf) (Max) @ If="550mV @ 1A", Category=Diodes, CategorySort=400, ComponentLink1Description="Internal Datasheet", ComponentLink1URL=http://www.diodes.com/datasheets/ds30498.pdf, ComponentLink2Description="External Datasheet", ComponentLink2URL=http://www.diodes.com/datasheets/ds30498.pdf, Diode Suffix=1A_2C, Diode Type=Schottky, Manufacturer Part Number=BAT760-7, Mounting Type="Surface Mount", Num Pins=2, Packaging="Cut Tape (CT)", Reverse Recovery Time (trr)=-, SortValue=BAT760-7, Speed="Fast Recovery =< 500ns- > 200mA (Io)", Supplier 1=Digi-Key
F1 F2 F3 F4: library part Fiducial
J1: library part MICROMOD-2222, "Micromod Edge Connector - M.2 2222 E Key"
L1: "Ind Chip Bead Multi-Layer 220Ohm 25% 100MHz Ferrite 1A 0402 T/R", Case Code (Imperial)=0402, Case Code (Metric)=1005, Current Rating=1A, DC Resistance (DCR)=250mR, Manufacturer=Abracon, Max Operating Temperature=125°C, Min Operating Temperature=-55°C, Package Quantity=1, Supplier Part Number 1=815-ACML-0402HC-221T, Test Frequency=100MHz, Tolerance=25%, Case/Package=0402, Category="Ferrite Beads and Chips", ComponentLink1Description=https://datasheet.ciiva.com/41798/acml-0402hc-41798311.pdf?src-supplier=Digikey, ComponentLink1URL=https://datasheet.ciiva.com/41798/acml-0402hc-41798311.pdf?src-supplier=Digikey, Height=0.026inch, Impedance=220R, Length=0.039inch, Manufacturer Part Number=ACML-0402HC-221-T, Max Current Rating=1A, Max DC Current=1A, Mounting Technology="Surface Mount", Number of Channels=1, Number of Lines=1, Packaging="Tape and Reel", Pricing="1=0.1, 10=0.032, 50=0.032, 100=0.023, 1000=0.015, 10000=0.015 (USD)", RoHS=Yes, RoHS Compliant=Yes, Series=ACML-HC, Shielding=Unshielded, Stock 1=3420, Supplier 1=Mouser, Termination=SMD/SMT, Weight=2.3E-05oz, Width=0.02inch
L2: library part NRH3012T2R2MN, "Inductor 2.2µH 1.5A", Inductance (uH)=2.2, Manufacturer="Taiyo Yuden", Package=NRH3012, Rating=-, Sort Value=2.2_1.5, Sort Value Package=2.2_1.5_NRH3012, Supplier Part Number 1=587-2589-1-ND, Tolerance=±20%, Category=Inductors, CategorySort=300, ComponentLink1Description="External Datasheet", ComponentLink1URL=https://www.yuden.co.jp/productdata/catalog/en/wound04_e.pdf, DCR Max (Ohms)="90 mOhm Max", Height (mm)=1.2MM, IRMS=1.37, Isat (A)=1.5, Manufacturer Part Number=NRH3012T2R2MN, Part Number=NRH3012T2R2MN, Shielding=Sheilded, SRF typ (MHz)=78MHz, Supplier 1=Digikey, Supplier Unit Price 1=0.28
R1: library part ERJ-3EKF1001V, "RES 1K OHM 1/10W 1% 0603 SMD", Limiting Element Voltage=75, Manufacturer="Panasonic Electronic Components", Maximum Overload Voltage=150, Maximum Working Voltage=10.0V, Package="0603 (1608 Metric)", Package Power="0603  (0.1W)", Power (Watts)="0.1W- 1/10W", Ratings=AEC-Q200, Sort Value=1000, Sort Value Package=603_1000, Supplier Package=0603, Supplier Part Number 1=P1.00KHCT-ND, Temperature Coefficient=±100ppm/°C, Tolerance=±1%, Category=Resistors, ComponentLink1Description="Internal Datasheet", ComponentLink1URL="datasheets\Panasonic Electronic Components\AOA0000CE2.pdf", ComponentLink2Description="External Datasheet", ComponentLink2URL=http://industrial.panasonic.com/www-data/pdf/AOA0000/AOA0000CE2.pdf, Composition="Thick Film", Features=-, Height=0.55MM, Manufacturer Part Number=ERJ-3EKF1001V, Number of Terminations=2, Packaging="Cut Tape (CT)", Resistance (Ohms)=1k, Size / Dimension="0.063\" L x 0.031\" W (1.60mm x 0.80mm)", Substitution Notes="1k , ±1% , 0603 , AEC-Q200", Supplier 1=Digi-Key
R2 R3 R7 R9: library part ERJ-3EKF1002V, "RES 10K OHM 1/10W 1% 0603 SMD", Limiting Element Voltage=75, Manufacturer="Panasonic Electronic Components", Maximum Overload Voltage=150, Maximum Working Voltage=31.6V, Package="0603 (1608 Metric)", Package Power="0603  (0.1W)", Power (Watts)="0.1W- 1/10W", Ratings=AEC-Q200, Sort Value=10000, Sort Value Package=603_10000, Supplier Package=0603, Supplier Part Number 1=P10.0KHCT-ND, Temperature Coefficient=±100ppm/°C, Tolerance=±1%, Category=Resistors, ComponentLink1Description="Internal Datasheet", ComponentLink1URL="datasheets\Panasonic Electronic Components\AOA0000CE2.pdf", ComponentLink2Description="External Datasheet", ComponentLink2URL=http://industrial.panasonic.com/www-data/pdf/AOA0000/AOA0000CE2.pdf, Composition="Thick Film", Features=-, Height=0.55MM, Manufacturer Part Number=ERJ-3EKF1002V, Number of Terminations=2, Packaging="Cut Tape (CT)", Resistance (Ohms)=10k, Size / Dimension="0.063\" L x 0.031\" W (1.60mm x 0.80mm)", Substitution Notes="10k , ±1% , 0603 , AEC-Q200", Supplier 1=Digi-Key
R4 R5: library part ERJ-3EKF33R0V, "RES 33 OHM 1/10W 1% 0603 SMD", Limiting Element Voltage=75, Manufacturer="Panasonic Electronic Components", Maximum Overload Voltage=150, Maximum Working Voltage=1.8V, Package="0603 (1608 Metric)", Package Power="0603  (0.1W)", Power (Watts)="0.1W- 1/10W", Ratings=AEC-Q200, Sort Value Package=603_33, Supplier Package=0603, Supplier Part Number 1=P33.0HCT-ND, Temperature Coefficient=±100ppm/°C, Tolerance=±1%, Category=Resistors, ComponentLink1Description="Internal Datasheet", ComponentLink1URL="datasheets\Panasonic Electronic Components\AOA0000CE2.pdf", ComponentLink2Description="External Datasheet", ComponentLink2URL=http://industrial.panasonic.com/www-data/pdf/AOA0000/AOA0000CE2.pdf, Composition="Thick Film", Features=-, Height=0.55MM, Manufacturer Part Number=ERJ-3EKF33R0V, Number of Terminations=2, Packaging="Cut Tape (CT)", Resistance (Ohms)=33, Size / Dimension="0.063\" L x 0.031\" W (1.60mm x 0.80mm)", Sort Value=33, Substitution Notes="33 , ±1% , 0603 , AEC-Q200", Supplier 1=Digi-Key
R6: library part ERJ-2GE0R00X, "RES 0.0 OHM 1/10W JUMP 0402 SMD", Limiting Element Voltage=50, Manufacturer="Panasonic Electronic Components", Maximum Overload Voltage=100, Maximum Working Voltage=0.0V, Package="0402 (1005 Metric)", Package Power="0402  (0.1W)", Power (Watts)="0.1W- 1/10W", Ratings=AEC-Q200, Sort Value Package=402_0, Supplier Package=0402, Supplier Part Number 1=P0.0JCT-ND, Temperature Coefficient=-, Tolerance=Jumper, Category=Resistors, ComponentLink1Description="Internal Datasheet", ComponentLink1URL="datasheets\Panasonic Electronic Components\AOA0000CE1.pdf", ComponentLink2Description="External Datasheet", ComponentLink2URL=http://industrial.panasonic.com/www-data/pdf/AOA0000/AOA0000CE1.pdf, Composition="Thick Film", Features=-, Height=0.40MM, Manufacturer Part Number=ERJ-2GE0R00X, Number of Terminations=2, Resistance (Ohms)=0, Size / Dimension="0.039\" L x 0.020\" W (1.00mm x 0.50mm)", Sort Value=0, Substitution Notes="0 , Jumper , 0402 , AEC-Q200", Supplier 1=Digi-Key
R8: library part ERJ-3EKF2002V, "RES 20K OHM 1/10W 1% 0603 SMD", Limiting Element Voltage=75, Manufacturer="Panasonic Electronic Components", Maximum Overload Voltage=150, Maximum Working Voltage=44.7V, Package="0603 (1608 Metric)", Package Power="0603  (0.1W)", Power (Watts)="0.1W- 1/10W", Ratings=AEC-Q200, Sort Value=20000, Sort Value Package=603_20000, Supplier Package=0603, Supplier Part Number 1=P20.0KHCT-ND, Temperature Coefficient=±100ppm/°C, Tolerance=±1%, Category=Resistors, ComponentLink1Description="Internal Datasheet", ComponentLink1URL="datasheets\Panasonic Electronic Components\AOA0000CE2.pdf", ComponentLink2Description="External Datasheet", ComponentLink2URL=http://industrial.panasonic.com/www-data/pdf/AOA0000/AOA0000CE2.pdf, Composition="Thick Film", Features=-, Height=0.55MM, Manufacturer Part Number=ERJ-3EKF2002V, Number of Terminations=2, Packaging="Cut Tape (CT)", Resistance (Ohms)=20k, Size / Dimension="0.063\" L x 0.031\" W (1.60mm x 0.80mm)", Substitution Notes="20k , ±1% , 0603 , AEC-Q200", Supplier 1=Digi-Key
U1: library part NX32N348VDFT_B, "IC MCX N94 150MHZ DUAL CORE NPU", Manufacturer="NXP SEMICONDUCTOR", Package Size=9x9, Package Type=SMD/SMT, Temp Range="-40  ¡ãC to +105 ¡ãC", 3D_Mechanical_Footprint_File=http://fcl.am.freescale.net/ALLEGRO/step/bga184_0p5_9x9_sm.STEP, AGILE_PN=TMP-CIP-10342, CAD_APPROVED=Yes, CLASS=IC, Height="0.98 MM", Manufacturer Part Number=MCXN947VDFT, MFG_NAME01="NXP SEMICONDUCTOR", MFG_PN01=MCXN947VDFT, PCB Footprint=bga184_0p5_9x9_sm, PRE_APN=344-02549, RoHS=Yes, SPLIT_INST=TRUE
U2: "3.3v Double-Data-Rate Octal SPI Xccela PSRAM", Manufacturer="AP Memory", Package=BGA-24, Availability="In Stock", Check_prices=https://eu.mouser.com/ProductDetail/AP-Memory/APS6408L-OBM-BA?qs=IS%252B4QmGtzzq1j2ngF%2F6ZwQ%3D%3D, Manufacturer Part Number=APS6408L-3OBM-BA, Mouser_Link=https://eu.mouser.com/ProductDetail/AP-Memory/APS6408L-OBM-BA?qs=IS%252B4QmGtzzq1j2ngF%2F6ZwQ%3D%3D, Price="2,09 €", Purchase-URL=https://eu.mouser.com/ProductDetail/AP-Memory/APS6408L-OBM-BA?qs=IS%252B4QmGtzzq1j2ngF%2F6ZwQ%3D%3D
X1: library part NX3215SA-32.768K-STD-MUA-9, "CRYSTAL 32.768KHZ 9PF SMD", Case/Package=SMD/SMT, ESR (Equivalent Series Resistance)=70kR, Frequency Tolerance=20ppm, Load Capacitance=9pF, Manufacturer=NDK, Max Operating Temperature=85°C, Min Operating Temperature=-40°C, Package Quantity=1000, Supplier Part Number 1=644-1155-6-ND, Frequency=32.768kHz, Height=0.035inch, Lead Free="Lead Free", Length=0.126inch, Manufacturer Part Number=NX3215SA-32.768K-STD-MUA-9, Mount="Surface Mount", Number of Pins=2, Packaging="Tape and Reel", Pricing 1="1=0.68, 10=0.602, 50=0.5628, 100=0.4974, 500=0.47124, 1000=0.3927 (USD)", Stock 1=39338, Supplier 1=Digi-Key, Width=0.059inch
Y1: library part ECS-240-12-37B-CKY-TR, "Crystal 24MHz ±10ppm (Tol) ±10ppm (Stability) 12pF FUND 50Ohm 4-Pin Mini-CSMD T/R", Manufacturer="ECS Inc.", Supplier Part Number 1=XC3064CT-ND, ComponentLink1Description=https://www.ecsxtal.com/store/pdf/ECX-1637B.pdf?src-supplier=Digi-Key, ComponentLink1URL=https://www.ecsxtal.com/store/pdf/ECX-1637B.pdf?src-supplier=Digi-Key, Manufacturer Part Number=ECS-240-12-37B-CKY-TR, Pricing="1=0.38, 10=0.313, 50=0.282, 100=0.2507, 500=0.23818 (USD)", RoHS=No, Stock 1=439340, Supplier 1=Digi-Key

## Via types
v1: diameter 15.75, hole 7.87, Top Layer to Bottom Layer, tented both sides, 186 vias
v2: diameter 22, hole 12, Top Layer to Bottom Layer, tented both sides, 2 vias
v3: diameter 18, hole 8, Top Layer to Bottom Layer, tented both sides, 1 vias

## Nets (pads, with @x,y where several pads share a name; then routed paths per layer and width w, separated by ;. In a path a pad name is that pad's centre, name@x,y a point inside that pad or via, vN(x,y) a via of type N, cw(c..) or ccw(c..) an arc to the next point about the centre after c; other vN are vias at no path point)
+3v3: C1.1 C2.2 C3.2 C4.1 C5.2 C6.2 C8.2 C9.2 C10.1 C11.2 C12.2 C22.1 C23.1 C25.1 C26.2 D2.1 J1.2 J1.74 L1.1 R2.2 R3.2 R9.2 U1.G7 U1.G11 U1.H6 U1.H8 U1.H10 U1.H12 U1.K8 U1.L7 U1.N5 U1.P4 U1.P15 U1.R12 U1.R15 U2.B4 U2.D1 U2.E4 | length 1907.3
  Top Layer w4: R3.2@-357.36,516.03 -357.36,515.49 -341.82,499.94 v1(-341.82,498.95) ; v1(-23.69,565.9) v1@-23.69,566.45 ; U1.G11@-4.51,566.45 U1.G11@-4.3,566.67 ; v1@14.48,566.67 v1(14.69,566.88) v1@14.93,567.12 ; U1.H12@14.93,585.9 U1.H12@15.17,586.14 ; v1@73.43,507.4 v1(73.8,507.77) v1@74.23,507.77 ; U1.P15@133.28,645.2 U1.P15@133.28,647.1 ; v1(133.79,447.79) v1@133.79,448.34 ; v1(152.8,565.77) v1@152.97,565.94 ; v1(152.8,662.77) v1(152.8,662.77) ; U1.R15@152.88,645.28 U1.R15@152.97,645.2
  Top Layer w8: U1.P15@133.28,645.2 U1.R15@152.97,645.2 ; U1.R15@152.88,645.28 v1(152.8,662.77) ; v1@152.97,565.94 U1.R12@152.97,586.14
  Top Layer w10: v1@-23.69,566.45 U1.G11@-4.51,566.45 ; U1.G7@-4.51,487.71 v1(14.8,487.77) v1(14.8,487.77) ; U1.G11@-4.3,566.67 v1@14.48,566.67 ; v1@14.93,567.12 U1.H12@14.93,585.9 ; U1.H6@15.17,468.03 U1.H8@15.17,507.4 ; U1.H10@15.17,546.77 v1@15.17,566.4 ; U1.K8@54.54,507.4 v1@73.43,507.4 ; U1.L7@74.23,487.71 v1@74.23,507.77 ; U1.N5@113.6,448.34 v1@133.79,448.34 ; U1.P4@133.79,429.16 v1(133.79,447.79)
  SIG1/PWR w10: v1(-341.82,498.95) -315.31,472.44 -266.73,472.44 -230.31,436.02 -140.75,436.02 -89,487.77 -3.94,487.77 ; v1(14.69,566.88) 14.69,565.77 -4.2,546.88 v1(-4.2,545.77) -4.2,488.03 -3.94,487.77 ; v1(14.8,487.77) -3.94,487.77
  Bottom Layer w4: U2.D1@-380.2,643.51 v1(-380.2,643.77) ; v1(-262.2,564.77) U2.B4@-262.09,564.77 ; v1(-262.2,682.77) U2.E4@-262.09,682.88 ; C3.2@14.8,591.07 C3.2@20.5,596.77 ; C1.1@71.8,664.07 C1.1@77.8,664.07 ; C1.1@73.8,660.07 C1.1@77.8,664.07 ; C1.1@78.5,664.77 C1.1@77.8,664.07 ; C4.1@112.1,678.47 C4.1@112.8,677.77 ; C4.1@112.8,674.82 C4.1@112.8,677.77 ; C4.1@113.8,678.47 113.5,678.47 C4.1@112.8,677.77 ; C10.1@152.8,444.47 C10.1@152.8,447.79 ; v1(152.8,662.77) 152.8,661.12 160.64,653.27 C9.2@161.6,653.27 ; J1.2@354.33,60.04 354.33,106.83 347.8,113.36 347.8,137.2 v1(362.13,151.53) ; D2.1@375.42,756.95 388.22,756.95 400,745.17 400,725.13 v1(400.18,724.95)
  Bottom Layer w8: C1.1@77.8,664.07 102.05,664.07 112.8,674.82 124.85,662.77 v1(152.8,662.77) ; C9.2@161.6,653.27 165.1,649.77 C25.1@216.8,649.77
  Bottom Layer w10: v1(-23.69,565.9) -23.69,542.97 -21.29,540.57 -21.29,539.61 -15.45,533.77 C6.2@-14.5,533.77 ; C5.2@-14.5,493.77 -9.65,488.93 12.09,488.93 13.25,487.77 v1(14.8,487.77) ; v1(133.79,447.79) C10.1@152.8,447.79
  Bottom Layer w12: C12.2@-21.32,455.11 -17.65,458.77 -15.5,458.77 -14.5,459.77 C5.2@-14.5,493.77 -14.5,533.77 C6.2@-13.5,534.77 ; v1(-4.2,545.77) 14.69,564.66 v1(14.69,566.88) ; C2.2@24.8,494.07 24.8,497.02 28.64,500.86 65.88,500.86 72.79,507.77 97.36,507.77 115.18,489.95 151.64,489.95 152.8,488.79 ; C10.1@152.8,444.47 198.96,444.47 C8.2@199.88,443.55 ; C10.1@152.8,447.79 152.8,488.79 ; v1@152.8,564.76 153.52,564.04 153.52,551.4 161.31,543.61 166.74,543.61 C11.2@166.74,499.77 ; C11.2@163.79,499.77 152.8,488.79 ; C8.2@201.8,442.52 C8.2@201.8,445.47 203.76,443.52 222.62,443.52 230.46,435.67 230.46,401.67 v1(231.18,400.95) ; L1.1@296.5,478.77 296.74,478.53 362.88,478.53 v1(363.12,478.3)
  Bottom Layer w14: J1.74@-354.33,60.04 -354.33,136.64 v1(-344.2,146.77) ; v1(14.69,566.88) 14.69,567.35 20.5,573.16 C3.2@20.5,596.77
  other v1: -386.88,356.25 -3.2,507.77
+5vUSB: J1.9 R7.2 | length 548.8
  Top Layer w4: J1.9@285.43,50.2 285.43,199.4 393.13,307.09 v1(393.13,529.95)
  Bottom Layer w4: v1(393.13,529.95) 393.13,554.35 R7.2@393.18,554.41
BAT-VIN/3: J1.49 U1.P3 | length 584.2
  Top Layer w4: J1.49@-108.27,50.2 -108.27,132.5 -104.23,136.54 v1(-104.23,139.71) ; v1(123.94,262.75) 137.72,262.75 152.49,277.51 152.49,300.15 159.38,307.04 159.38,340.5 148.55,351.33 131.23,351.33 128.87,353.69 121.98,360.58 121.98,364.63 121.77,364.84 121.77,394.06 121.98,394.26 121.98,397.67 U1.P3@133.28,408.97
  SIG1/PWR w4: v1(-104.23,139.71) -50.27,139.71 -2.04,187.94 -2.04,212.55 12.72,227.31 86.54,227.31 121.98,262.75 v1(123.94,262.75)
DAC2-OUT: J1.34 U1.U2 | length 461.8
  Top Layer w4: U1.U2@192.34,389.29 205.18,376.45 205.18,283.46 v1(206.21,282.43)
  Bottom Layer w4: J1.34@39.37,60.04 39.37,179.16 72.81,212.6 171.24,212.6 205.3,246.66 205.3,281.52 v1(206.21,282.43)
DCDC-LX: L2.2 U1.P17 | length 161.5
  Top Layer w10: v1(88.51,733.22) 88.78,732.95 107.05,732.95 133.28,706.72 U1.P17@133.28,684.57
  Bottom Layer w10: L2.2@5.11,733.77 L2.2@5.66,733.22
  Bottom Layer w12: L2.2@5.66,733.22 v1(69.81,733.22) v1(88.51,733.22)
FLEXSPI0A-D0: U1.E14 U2.D3 | length 612
  Top Layer w4: v1(-186.2,744.77) -172.2,744.77 -161.78,755.19 -72.12,755.19 -43.88,726.95 U1.E14@-43.88,625.51
  Bottom Layer w4: U2.D3@-301.46,643.51 -321.2,663.25 -321.2,734.37 -321.2,737.2 ccw(c-328.88,737.2) -323.43,742.62 -325.06,744.25 cw(c-321.88,747.43) -325.06,750.61 cw(c-321.88,747.43) -318.7,750.61 -296.4,728.32 ccw(c-293.22,731.5) -290.04,728.32 ccw(c-293.22,731.5) -290.04,734.68 -305.48,750.12 cw(c-302.3,753.31) -305.48,756.49 -279.51,782.46 -276.55,785.41 -270.2,791.77 -269.25,791.77 -233.89,791.77 -217.62,775.49 -186.89,744.77 v1(-186.2,744.77)
FLEXSPI0A-D1: U1.F15 U2.D2 | length 612
  Top Layer w4: v1(-171.57,765.35) -170.78,764.56 -65.74,764.56 -35.88,734.7 -35.88,656.88 U1.F15@-24.2,645.2
  Bottom Layer w4: U2.D2@-340.83,643.51 -360.2,662.88 -360.2,745.08 -298.5,806.77 -268.99,806.77 -266.99,806.77 ccw(c-266.99,811.27) -262.49,811.27 -262.49,820.32 cw(c-257.99,820.32) -253.49,820.32 -253.49,811.27 ccw(c-248.99,811.27) -248.99,806.77 -239.17,806.77 -222.51,806.77 -213.41,806.77 -171.99,765.35 v1(-171.57,765.35)
FLEXSPI0A-D2: U1.F17 U2.C4 | length 612.2
  Top Layer w4: v1(-273.2,722.77) -273.2,736.67 -264.1,745.77 -245.15,745.77 -235.15,745.77 cw(c-235.15,741.77) -231.15,741.77 -231.15,739.44 ccw(c-227.15,739.44) -223.15,739.44 -223.15,752.58 cw(c-219.15,752.58) -221.98,755.41 -206.76,770.62 -194.62,782.77 -157.77,782.77 -147.77,772.77 -57.22,772.77 -24.2,739.75 U1.F17@-24.2,684.57
  Bottom Layer w4: v1(-273.2,722.77) -273.2,722.39 -273.2,718.98 -281.98,710.2 cw(c-284.81,713.03) -284.81,709.03 -286.53,709.03 ccw(c-286.53,705.03) -286.53,701.03 -275.56,701.03 cw(c-275.56,697.03) -275.56,693.03 -283.38,693.03 ccw(c-283.38,689.03) -283.38,685.03 -280.07,685.03 cw(c-280.07,681.03) -280.07,677.03 -283.62,677.03 ccw(c-283.62,673.03) -283.62,669.03 -272.08,669.03 cw(c-272.08,665.03) -272.08,661.03 -288.19,661.03 ccw(c-288.19,657.03) -288.19,653.03 -279.37,653.03 cw(c-279.37,649.03) -279.37,645.03 -280.2,645.03 ccw(c-280.2,641.03) -284.2,641.03 -284.2,631.03 -284.2,626.25 U2.C4@-262.09,604.14
FLEXSPI0A-D3: U1.F16 U2.D4 | length 611.2
  Top Layer w4: v1(-261.2,643.77) -262.03,644.61 -271.98,644.61 -276.79,649.41 -278.2,650.83 ccw(c-281.03,648) -283.86,650.83 -295.88,638.81 cw(c-298.71,641.64) -301.54,638.81 cw(c-298.71,641.64) -301.54,644.46 -287.66,658.34 ccw(c-290.49,661.17) -286.49,661.17 -286.49,693.85 -286.49,698.17 -291.41,703.09 -291.41,736.56 -284.52,743.45 -282.52,745.45 ccw(c-287.35,750.28) -280.52,750.28 -280.52,782.26 cw(c-276.52,782.26) -272.52,782.26 -272.52,765.77 ccw(c-268.52,765.77) -268.52,761.77 -255.98,761.77 -236.28,761.77 -207.28,790.77 -153.96,790.77 -143.96,780.77 -51.44,780.77 -12.69,742.02 -12.69,676.39 U1.F16@-24.2,664.88
FLEXSPI0A-D4: U1.G16 U2.D5 | length 613.2
  Top Layer w4: v1(-250.2,776.77) -227.97,799 -149.39,799 -139.16,788.77 -44.68,788.77 -4.51,748.61 U1.G16@-4.51,664.88
  Bottom Layer w4: v1(-250.2,776.77) -249.2,776.77 -233.21,760.78 -228.7,756.27 -212.03,739.61 cw(c-214.86,736.78) -214.86,732.78 -226.32,732.78 ccw(c-226.32,728.78) -226.32,724.78 -202.1,724.78 cw(c-202.1,720.78) -202.1,716.78 -228.66,716.78 ccw(c-228.66,712.78) -228.66,708.78 -211.66,708.78 cw(c-211.66,704.78) -207.66,704.78 -207.66,696.8 -207.66,658.56 U2.D5@-222.72,643.51
FLEXSPI0A-D5: U1.H16 U2.E3 | length 612.5
  Top Layer w4: v1(-301.25,683.02) -302.57,684.34 -302.57,710.47 -302.57,712.47 ccw(c-306.57,712.47) -306.57,716.47 -330.41,716.47 cw(c-330.41,720.47) -330.41,724.47 -303.41,724.47 ccw(c-303.41,728.47) -303.41,732.47 -311.48,732.47 cw(c-311.48,736.47) -311.48,740.47 -306.57,740.47 ccw(c-306.57,744.47) -302.57,744.47 -302.57,756.84 -302.57,777.77 -273.34,807 -145.58,807 -135.35,796.77 -37.91,796.77 3.49,755.37 3.49,677.77 15.17,666.08 U1.H16@15.17,664.88
  Bottom Layer w4: U2.E3@-301.46,682.88 -301.32,683.02 v1(-301.25,683.02)
FLEXSPI0A-D6: U1.H17 U2.E2 | length 612.2
  Top Layer w4: v1(-341.2,682.77) -342.41,683.98 -342.41,689.96 -342.41,714 -342.41,716 ccw(c-346.41,716) -346.41,720 -367.39,720 cw(c-367.39,724) -367.39,728 -346.41,728 ccw(c-346.41,732) -342.41,732 -342.41,752 -342.41,752.95 -342.41,769.82 -333.18,779.05 -306.11,806.11 -297.23,815 -141.31,815 -131.08,804.77 -31.15,804.77 15.17,758.45 U1.H17@15.17,684.57
FLEXSPI0A-D7: U1.H15 U2.E1 | length 646
  Top Layer w4: v1(-380.2,682.77) -380.2,743.34 -300.54,823 -138,823 -128,813 -27,813 27,759 27,657.02 U1.H15@15.17,645.2
FLEXSPI0A-DQS: U1.D17 U2.C3 | length 601.5
  Top Layer w4: v1(-244.2,726.77) -243.53,727.44 -235.41,727.44 -184.52,727.44 -79.87,727.44 -63.57,711.14 U1.D17@-63.57,684.57
  Bottom Layer w4: U2.C3@-301.46,604.14 -288.62,591.3 -288.13,590.81 -279.09,581.77 -250.2,581.77 -245.2,586.77 -245.2,597.5 -245.2,607.5 cw(c-241.2,607.5) -241.2,611.5 -238.14,611.5 ccw(c-238.14,615.5) -238.14,619.5 -262.14,619.5 cw(c-262.14,623.5) -262.14,627.5 -237.5,627.5 ccw(c-237.5,631.5) -237.5,635.5 -243.32,635.5 cw(c-243.32,639.5) -243.32,643.5 -240,643.5 ccw(c-240,647.5) -240,651.5 -245.31,651.5 cw(c-245.31,655.5) -245.31,659.5 -225.2,659.5 ccw(c-225.2,663.5) -225.2,667.5 -245.84,667.5 cw(c-245.84,671.5) -245.84,675.5 -241.17,675.5 ccw(c-241.17,679.5) -241.17,683.5 -244.32,683.5 cw(c-244.32,687.5) -244.32,691.5 -237.88,691.5 ccw(c-237.88,695.5) -237.88,699.5 -241.2,699.5 cw(c-241.2,703.5) -245.2,703.5 -245.2,714.63 -245.2,725.77 v1(-244.2,726.77)
FLEXSPI0A-SCK: U1.D14 U2.B2 | length 612
  Top Layer w4: v1(-154.2,741.31) -73.99,741.31 -51.88,719.21 -51.88,637.2 U1.D14@-63.57,625.51
  Bottom Layer w4: v1(-340.83,564.77) -320.3,544.24 -297.24,544.24 -295.24,544.24 ccw(c-295.24,548.74) -290.74,548.74 -290.74,549.17 cw(c-286.24,549.17) -281.74,549.17 -281.74,548.74 ccw(c-277.24,548.74) -277.24,544.24 -235.24,544.24 -215.62,544.24 -205.78,554.08 -205.78,643.65 -196.92,652.51 -196.92,701.99 -196.92,706.64 -182.28,721.29 cw(c-179.45,718.46) -176.62,721.29 -169.26,713.93 ccw(c-166.43,716.76) -163.6,713.93 ccw(c-166.43,716.76) -163.6,719.58 -170.96,726.95 cw(c-168.13,729.77) -170.96,732.6 -164.04,739.53 -155.98,739.53 -154.51,741 v1(-154.2,741.31)
FLEXSPI0A-SS0-N: R3.1 U1.B17 U2.A3 | length 612
  Top Layer w4: v1(-301.2,525.77) -282.2,544.77 -243.2,544.77 -242.74,545.23 -239.57,548.4 ccw(c-242.4,551.23) -242.4,555.23 -244.32,555.23 cw(c-244.32,559.23) -244.32,563.23 -202.86,563.23 ccw(c-202.86,567.23) -202.86,571.23 -245.03,571.23 cw(c-245.03,575.23) -245.03,579.23 -195.69,579.23 ccw(c-195.69,583.23) -195.69,587.23 -273.2,587.23 cw(c-273.2,591.23) -273.2,595.23 -218.9,595.23 ccw(c-218.9,599.23) -218.9,603.23 -223.2,603.23 cw(c-223.2,607.23) -227.2,607.23 -227.2,627.16 -226.65,627.7 -156.58,697.77 -116.14,697.77 U1.B17@-102.94,684.57